# Altium PCB PCB1.PcbDoc (part 2 of 3)
Units mil, origin at the board's own origin, x right, y up, seen from the top; angles counter-clockwise.
Board outline 7110 x 5135 mil, 4 copper layers (Top Layer, Layer 1, Layer 2, Bottom Layer), stack 23.756 mil thick; 224 components, 137 nets, 658 pads, 306 vias.
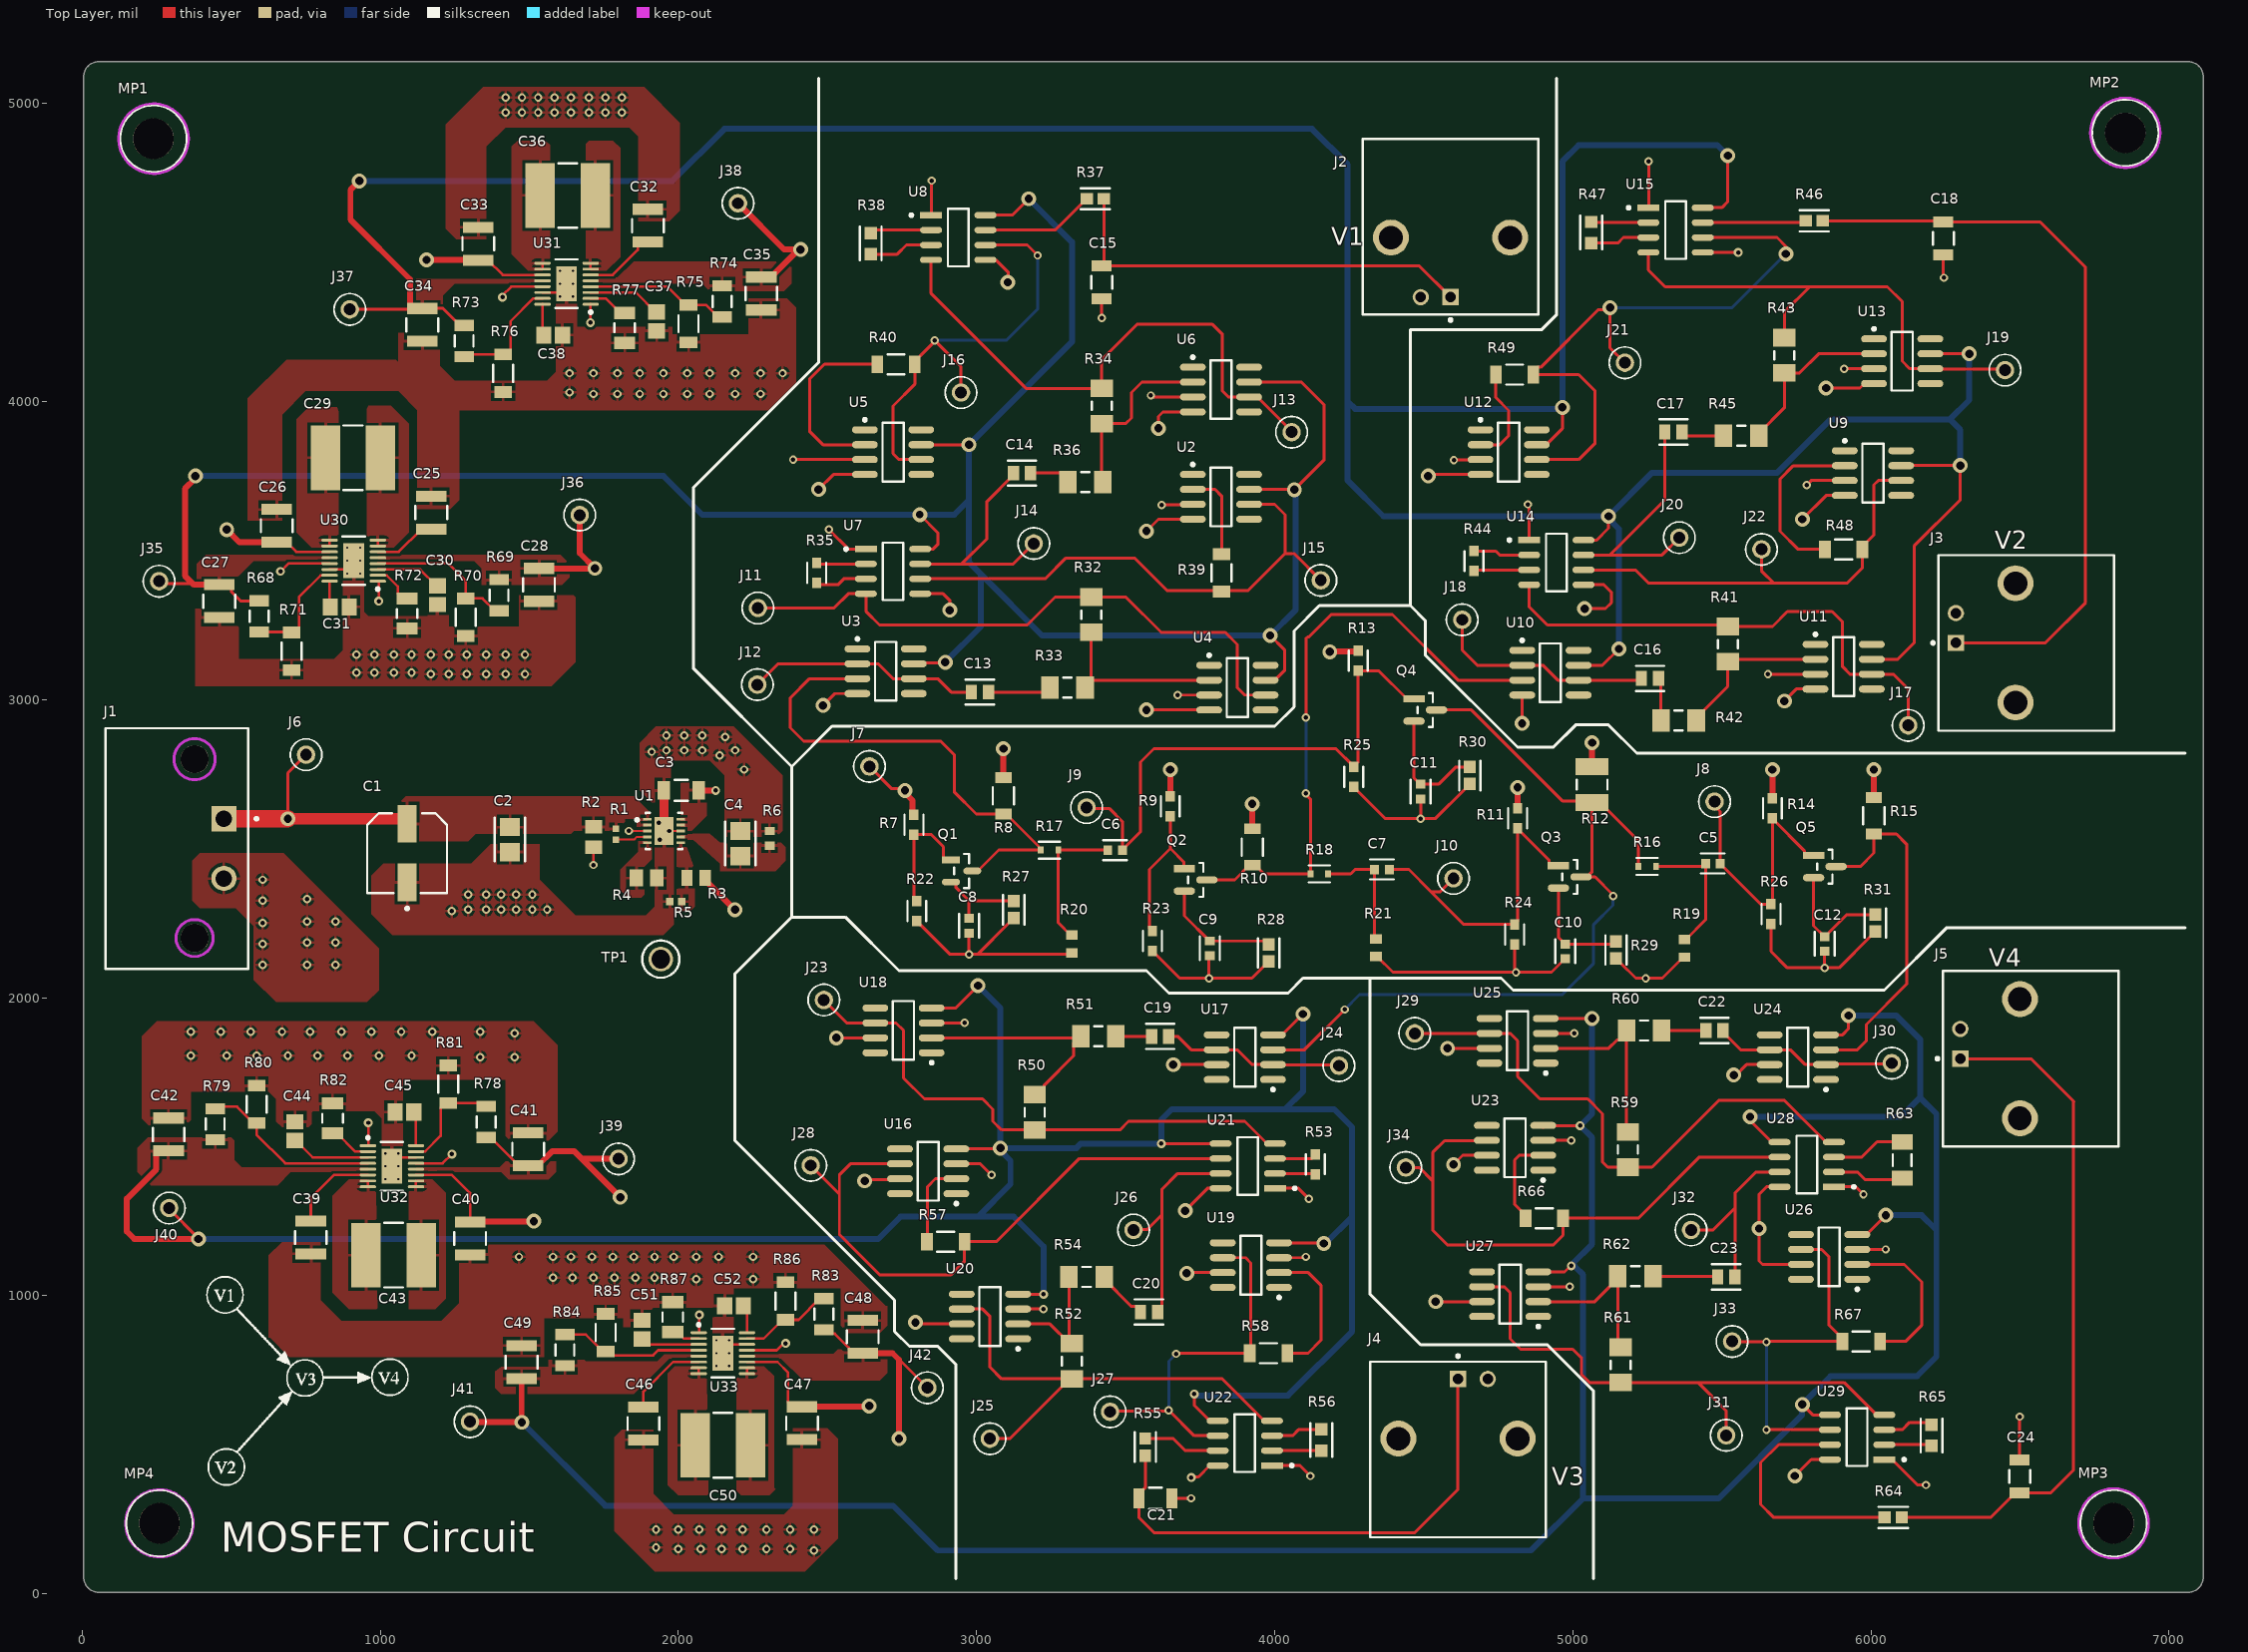
[diagram p0: Top Layer view]

## Via types
v1: diameter 28, hole 15, Top Layer to Bottom Layer, 195 vias
v2: diameter 50, hole 28, Top Layer to Bottom Layer, 70 vias
v3: diameter 19.68, hole 7.87, Top Layer to Bottom Layer, 24 vias
v4: diameter 30, hole 15, Top Layer to Bottom Layer, 16 vias
v5: diameter 50, hole 25, Top Layer to Bottom Layer, 1 vias

## Nets (pads, with @x,y where several pads share a name; then routed paths per layer and width w, separated by ;. In a path a pad name is that pad's centre, name@x,y a point inside that pad or via, vN(x,y) a via of type N, cw(c..) or ccw(c..) an arc to the next point about the centre after c; other vN are vias at no path point) (continued)
+15V: (continued)
  Layer 2 w20: 485,3040 775,3330 ; 485,4075 625,4215 1330,4215 ; v4(665,3430) 715.96,3379.04 725.96,3379.04 775,3330 ; v4(960,1580) 1135,1580 v4(1240,1475) 1365,1350 1415,1350 v2(1515,1250) ; v4(995,3330) 775,3330 ; v4(1410,4350) 1410,4295 1330,4215 ; v4(1705,4265) 1655,4215 1330,4215 ; v4(2070,935) 2153.85,935 2168.85,950 2250,950 v4(2360,840) 2430,840 v2(2640,630)
  Layer 2 w40: v2(1155,4475) 600,4475 485,4360 485,4075 v2(485,3570) 485,3040 485,2805 v2(690,2600) 690,2085 730,2045 1640,2045 1690,1995 1690,1425 v2(1515,1250) 1515,1110 1105,700 1105,490 1180,415 2450,415 2638.09,603.09 2638.09,628.09 v2(2640,630)
GND: C1.1 C2.2 C3.2 C4.2 C8.2 C9.2 C10.2 C11.2 C12.2 C15.2 C18.2 C21.2 C24.2 C25.2 C26.2 C27.2 C28.2 C30.1 C31.1 C32.2 C33.2 C34.2 C35.2 C37.1 C38.1 C39.2 C40.2 C41.2 C42.2 C44.1 C45.1 C46.2 C47.2 C48.2 C49.2 C51.1 C52.1 J1.2 J2.2 J3.2 J4.2 J5.2 R4.1 R5.1 R6.1 R19.1 R20.1 R21.1 R22.1 R23.1 R24.1 R25.1 R26.1 R27.1 R28.1 R29.1 R30.1 R31.1 R70.2 R71.2 R72.1 R75.2 R76.2 R77.1 R80.2 R81.2 R82.1 R85.2 R86.2 R87.1 TP1.1 U1.8 U1.11 U2.3 U4.3 U5.3 U6.3 U7.1 U8.1 U9.3 U11.3 U12.3 U13.3 U14.1 U15.1 U16.3 U18.3 U19.3 U20.3 U21.1 U22.1 U23.3 U25.3 U26.3 U27.3 U28.1 U29.1 U30.14 U30.17 U31.14 U31.17 U32.14 U32.17 U33.14 U33.17 | length 7444.1
  Top Layer w7: v1(1969,2558.98) U1.8@2008.03,2558.98
  Top Layer w8.5: U30.14@830.29,3436.47 881.47,3436.47 U30.17@911,3466 ; U32.17@1039.29,1434.21 1068.82,1463.74 U32.14@1120,1463.74 ; U31.14@1544.29,4365.47 1595.47,4365.47 U31.17@1625,4395 ; U33.17@2149,807 2178.53,836.53 U33.14@2229.71,836.53
  Top Layer w10: U1.11@1951.95,2559 U1.11@1968,2559 ; v1(2385,3805) U5.3@2625.51,3805 ; v1(2505,3570) 2570,3505 U7.1@2628.82,3505 ; R22.1@2800,2256.54 2800,2254.57 2810.75,2243.82 2812.72,2243.82 2911.54,2145 v1(2975,2145) ; U8.1@2847.63,4625 2849,4626.37 v1(2849,4741) ; U18.3@2849.49,1915 v1(2960,1915) ; U16.3@2932.24,1442.24 3012.75,1442.24 v1(3049.98,1405.01) ; C8.2@2975,2216.37 v1(2975,2145) ; R27.1@3125,2266.43 3125,2265.47 3110.19,2250.67 3109.23,2250.67 3003.57,2145 ; U20.3@3139.49,955 v1(3225,955) ; R20.1@3320,2150.47 3314.53,2145 3003.57,2145 ; v1(3420,4280) C15.2@3420,4344.88 ; v1(3585,4020) 3590,4015 U6.3@3725.51,4015 ; R23.1@3590,2156.54 3590,2154.57 3600.75,2143.82 3602.72,2143.82 3681.54,2065 v1(3780,2065) ; v1(3621,3653) 3622,3654 3724.51,3654 U2.3@3725.51,3655 ; C21.2@3655,320 v1(3720,320) ; v1(3675,3015) U4.3@3780.51,3015 ; C9.2@3782.64,2140.59 3780,2137.95 v1(3780,2065) ; R28.1@3980,2121.43 3980,2120.47 3965.19,2105.67 3964.23,2105.67 3923.57,2065 v1(3780,2065) ; U22.1@3991.18,430 4085,430 v1(4120,395) ; U21.1@4001.18,1360 4080,1360 v1(4115,1325) ; U19.3@4014.92,1127.28 4102.28,1127.28 v1(4105,1130) ; R25.1@4265,2706.54 4265,2704.57 4275.75,2693.82 4277.72,2693.82 4371.54,2600 v1(4490,2600) ; R21.1@4340,2137.48 4343.94,2137.48 4396.42,2085 v1(4810,2085) ; C11.2@4490,2666.37 v1(4490,2600) ; v1(4601,3803) 4602,3804 4689.51,3804 U12.3@4690.51,3805 ; R30.1@4655,2716.43 4655,2715.47 4640.19,2700.67 4639.23,2700.67 4538.57,2600 v1(4490,2600) ; R24.1@4805,2178.54 4805,2094.06 4810,2089.06 v1(4810,2085) ; v1(4850,3655) 4853.82,3651.18 U14.1@4853.82,3535 ; U27.3@4884.49,1030 v1(4990,1030) ; U23.3@4900.75,1520.98 4994.02,1520.98 v1(4995,1520) ; U25.3@4909.49,1880 4995,1880 4995.86,1879.14 5004.14,1879.14 v1(5005,1880) ; C10.2@4975,2130.32 4973.94,2130.32 4928.62,2085 v1(4810,2085) ; R29.1@5145,2131.43 5145,2130.47 5159.81,2115.67 5160.77,2115.67 5211.43,2065 v1(5245,2065) 5300.59,2065 5371.06,2135.47 R19.1@5375,2135.47 ; U15.1@5253.82,4650 5255,4651.18 v1(5255,4805) ; v1(5655,3085) 5655.16,3085.16 U11.3@5814.13,3085.16 ; R26.1@5665,2246.54 5665,2155 5720,2100 v1(5845,2100) ; v1(5785,3720) 5799.76,3734.76 U9.3@5912.56,3734.76 ; C12.2@5845,2155.32 v1(5845,2100) ; U28.1@5876.18,1365 5950,1365 v1(5975,1340) ; v1(5910,4110) U13.3@6010.51,4110 ; U26.3@5954.49,1155 v1(6050,1155) ; R31.1@6015,2221.43 6015,2220.47 6000.19,2205.67 5999.23,2205.67 5893.57,2100 v1(5845,2100) ; U29.1@6045,450 6071.22,450 6156.22,365 v1(6185,365) ; C18.2@6243.27,4492.05 6243.27,4416.73 v1(6245,4415) ; C24.2@6499.17,448.74 v1(6499.17,594.17) ; v1(2975,2145) 3003.57,2145
  Top Layer w30: U1.11@1940,2585 1945.67,2585 1951.5,2590.83 C3.2@1951.5,2695.63 ; U1.11@1951.5,2585 1968,2568.5 U1.11@1968,2559
  other v1: 2455,145 2000,150 2075,150 2145,150 2215,150 2295,150 2375,150 1925,155 1925,215 2000,215 2070,215 2145,215 2215,215 2295,215 2375,215 2455,215 2060,1055 2250,1055 1580,1060 1645,1060 1715,1060 1785,1060 1855,1060 1920,1060 1465,1130 1580,1130 1640,1130 1710,1130 1780,1130 1850,1130 1920,1130 1985,1130 2060,1130 2135,1130 2250,1130 1335,1800 1450,1800 365,1805 485,1805 585,1805 690,1805 790,1805 890,1805 995,1805 1105,1805 1450,1880 365,1885 465,1885 565,1885 670,1885 765,1885 870,1885 970,1885 1070,1885 1175,1885 1335,1885 605,2110 755,2110 850,2110 605,2180 755,2185 850,2185 605,2250 755,2255 850,2255 1240,2290 1295,2295 1355,2295 1405,2295 1455,2295 1510,2295 1560,2295 605,2325 755,2330 1295,2345 1355,2345 1405,2345 1455,2345 1510,2345 605,2395 1937,2530 1935,2587 2220,2765 2138.21,2812.25 1910,2825 1960,2830 2020,2830 2080,2830 2190,2830 2157.28,2875 1960,2880 2020,2880 2080,2880 1170,3085 1230,3085 1290,3085 1355,3085 1420,3085 1485,3085 920,3090 980,3090 1045,3090 1105,3090 920,3150 980,3150 1045,3150 1105,3150 1170,3150 1230,3150 1290,3150 1355,3150 1420,3150 1485,3150 1715,4025 1795,4025 1870,4025 1950,4025 2030,4025 2105,4025 2190,4025 2275,4025 1635,4030 1635,4095 1715,4095 1795,4095 1870,4095 1950,4095 2030,4095 2105,4095 2190,4095 2275,4095 2350,4095 1420,4970 1475,4970 1530,4970 1585,4970 1640,4970 1700,4970 1755,4970 1810,4970 1420,5020 1475,5020 1530,5020 1585,5020 1640,5020 1700,5020 1755,5020 1810,5020
  other v3: 2127.35,763.69 2170.65,763.69 2127.35,807 2170.65,807 2127.35,850.31 2170.65,850.31 1017.64,1390.9 1060.95,1390.9 1017.64,1434.21 1060.95,1434.21 1017.64,1477.52 1060.95,1477.52 889.35,3422.69 932.65,3422.69 889.35,3466 932.65,3466 889.35,3509.31 932.65,3509.31 1603.35,4351.69 1646.65,4351.69 1603.35,4395 1646.65,4395 1603.35,4438.31 1646.65,4438.31
NetC3_1: C3.1 J7.1 R3.2 R7.2 R8.2 R9.2 R10.2 R11.2 R12.2 R13.2 R14.2 R15.2 U1.9 U1.10 | length 6771.8
  Top Layer w10: J7.1@2640.91,2775.51 2715.68,2700.74 v2@2754.26,2700.74
  Top Layer w20: C3.1@2067.64,2695.63 2068.27,2695 v4(2125,2695) ; R3.2@2089.72,2401.5 2089.72,2393.62 2188.35,2295 v2(2190,2295) ; v2@2754.26,2700.74 v2(2760,2695) 2760,2686.88 2785.7,2661.18 2785.7,2617.76 R7.2@2790,2613.46 ; R8.2@3090,2738.03 v2(3090,2835) ; R9.2@3650,2675.47 v2(3650,2765) ; R10.2@3925,2566.02 v2(3925,2650) ; v2(4185,3160) 4186.73,3161.73 4278.27,3161.73 R13.2@4280,3163.46 ; R11.2@4815,2635.47 v2(4815,2705) ; R12.2@5065,2775.04 v2(5065,2855) ; R14.2@5670,2668.46 v2(5670,2765) ; R15.2@6010,2671.02 v2(6010,2765)
  Layer 2 w20: v4(2125,2695) 2442.5,2695 ; v2(2190,2295) 2197.78,2295 2232.78,2260 2450,2260 2540,2350 2540,2597.5 2442.5,2695 ; v2(4185,3160) 4185,2700 4135,2650 ; v2(6010,2765) v2(5670,2765) 5295,2765 5205,2855 v2(5065,2855) 5060,2860 4970,2860 v2(4815,2705) 4780,2705 4735,2660 4735,2575 4700,2540 4245,2540 4135,2650 ; 2442.5,2695 v2(2760,2695) 2760,2700 2900,2840 3085,2840 v2(3090,2835) 3580,2835 v2(3650,2765) 3810,2765 v2(3925,2650) 4135,2650
NetC4_1: C4.1 R6.2 U1.7